# Altium PCB CM5IO_V2.PcbDoc (part 3 of 4)
Units mm, origin at the board's own origin, x right, y up, seen from the top; angles counter-clockwise.
Board outline 160 x 90 mm, 4 copper layers (F.Cu, In1.Cu, In2.Cu, B.Cu); 77 components, 161 nets, 674 pads, 703 vias.
Unrouted connection lines stored in the file: 47.
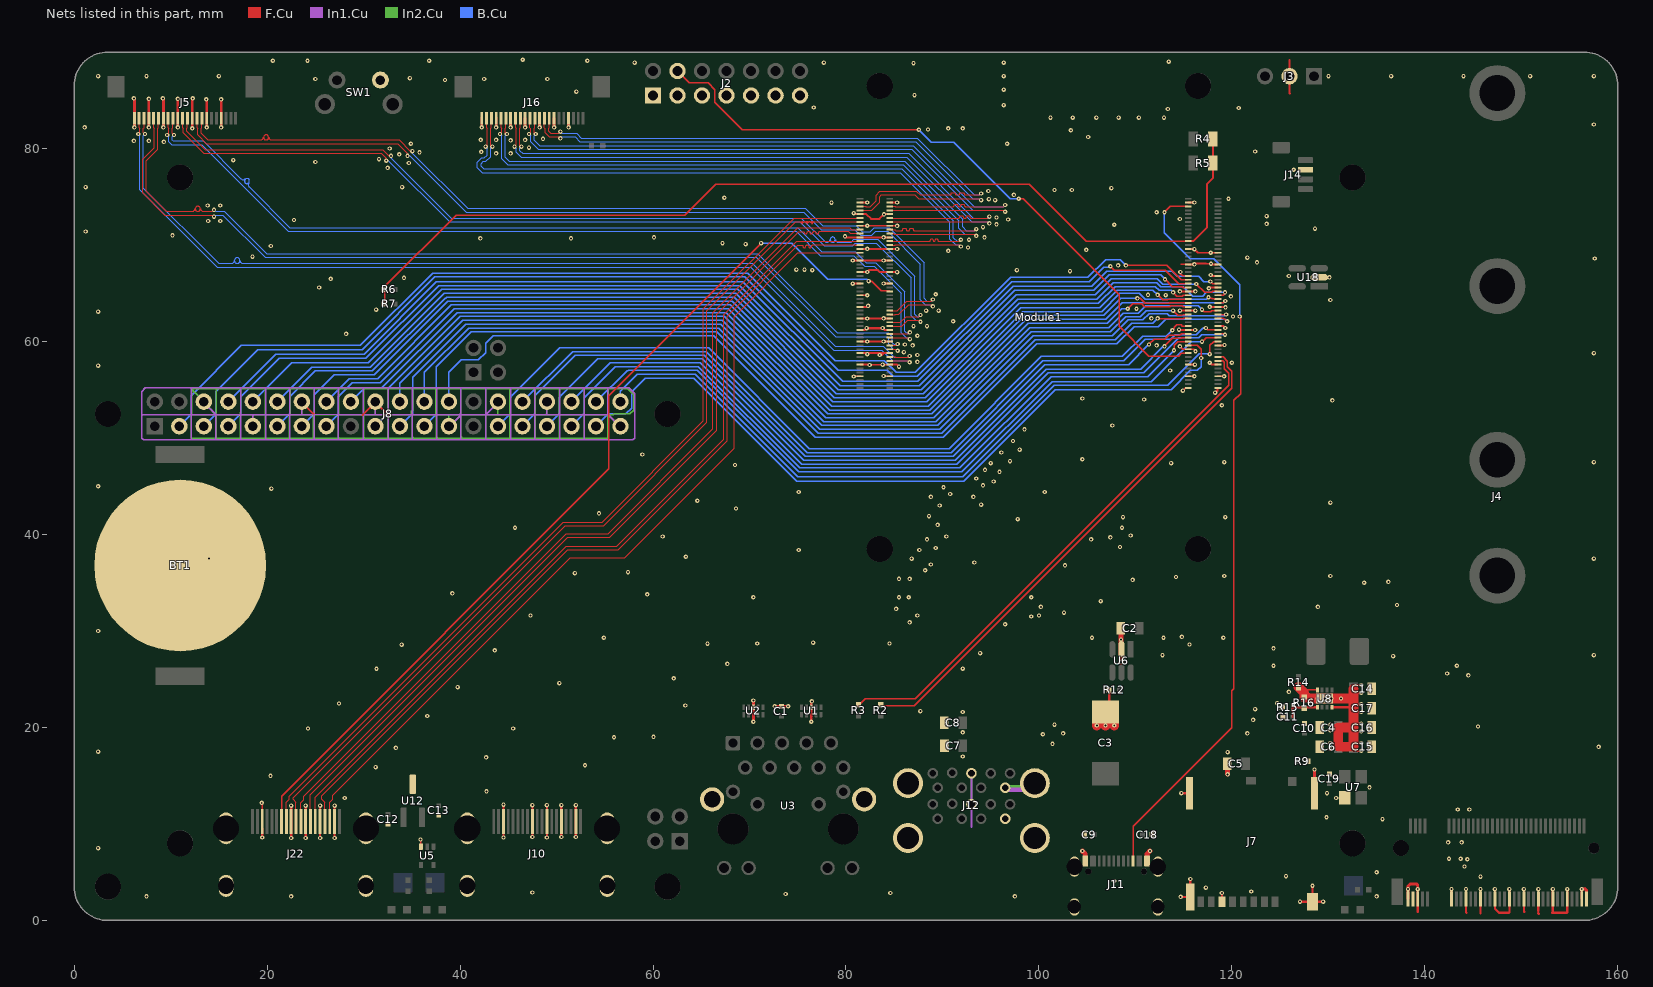
[diagram p4: the nets of this part, all layers, seen from the top]

## Via types
v1: diameter 0.45, hole 0.2, F.Cu to B.Cu, tented both sides, 703 vias

## Nets (pads, with @x,y where several pads share a name; then routed paths per layer and width w, separated by ;. In a path a pad name is that pad's centre, name@x,y a point inside that pad or via, vN(x,y) a via of type N, cw(c..) or ccw(c..) an arc to the next point about the centre after c; other vN are vias at no path point) (continued)
CC2: J11.B5 Module1.96 | length 79.2
  F.Cu w0.13: J11.B5@109.75,6.155 109.75,9.75 120,20 120,23.8 120.2,24 120.2,53.9 120.9,54.6 120.9,62.5 v1(120.8,62.6) ; v1(113,73.4) 113.6,74 Module1.96@115.42,74
  B.Cu w0.13: v1(113,73.4) 113,71.3 115.7,68.6 118.1,68.6 120.82,65.88 120.82,62.62 v1(120.8,62.6)
DPHY0_C_N: J5.8 Module1.127 | length 92.4
  F.Cu w0.127: v1(9.65,81.4) 9.81,81.56 9.81,82.115 9.75,82.175 J5.8@9.75,83.15 ; Module1.127@84.58,60.4 85.105,60.4 85.115,60.41 86.454,60.41 v1(86.615,60.249)
  B.Cu w0.127: v1(9.65,81.4) 9.81,81.24 9.81,80.721 10.121,80.41 13.221,80.41 22.221,71.41 74.821,71.41 77.321,68.91 80.821,68.91 81.921,67.81 82.921,67.81 85.71,65.021 85.71,60.921 86.221,60.41 86.454,60.41 v1(86.615,60.249)
DPHY0_C_P: J5.9 Module1.129 | length 94.1
  F.Cu w0.127: J5.9@10.25,83.15 10.25,82.175 10.19,82.115 10.19,81.56 v1(10.35,81.4) ; Module1.129@84.58,60.8 85.105,60.8 85.115,60.79 86.454,60.79 v1(86.615,60.952)
  B.Cu w0.127: v1(10.35,81.4) 10.19,81.24 10.19,80.879 10.279,80.79 13.379,80.79 17.286,76.883 17.32,76.849 ccw(c17.515,77.044) 17.71,76.849 ccw(c17.905,76.654) 18.1,76.849 18.134,76.814 ccw(c17.939,76.619) 18.134,76.424 ccw(c18.329,76.229) 18.134,76.034 22.379,71.79 74.979,71.79 77.479,69.29 80.979,69.29 82.079,68.19 83.079,68.19 86.09,65.179 86.09,61.079 86.379,60.79 86.454,60.79 v1(86.615,60.952)
DPHY0_D0_N: J5.2 Module1.115 | length 96.9
  F.Cu w0.127: v1(6.65,81.5) 6.81,81.66 6.81,82.115 6.75,82.175 J5.2@6.75,83.15 ; Module1.115@84.58,58 85.105,58 85.115,58.01 86.44,58.01 v1(86.6,57.85)
  B.Cu w0.127: v1(6.65,81.5) 6.81,81.34 6.81,75.721 14.821,67.71 70.121,67.71 78.721,59.11 82.018,59.11 82.027,59.119 82.373,59.119 82.382,59.11 83.721,59.11 84.821,58.01 86.44,58.01 v1(86.6,57.85)
DPHY0_D0_P: J5.3 Module1.117 | length 98.7
  F.Cu w0.127: J5.3@7.25,83.15 7.25,82.175 7.19,82.115 7.19,81.66 v1(7.35,81.5) ; Module1.117@84.58,58.4 85.105,58.4 85.115,58.39 86.49,58.39 v1(86.6,58.5)
  B.Cu w0.127: v1(7.35,81.5) 7.19,81.34 7.19,75.879 14.979,68.09 15.01,68.09 16.312,68.09 ccw(c16.312,68.384) 16.606,68.384 ccw(c16.9,68.384) 16.9,68.678 16.912,68.678 ccw(c16.912,68.384) 17.206,68.384 ccw(c17.5,68.384) 17.5,68.09 70.279,68.09 78.879,59.49 81.861,59.49 81.869,59.498 82.531,59.498 82.539,59.49 83.879,59.49 84.979,58.39 86.49,58.39 v1(86.6,58.5)
DPHY0_D1_N: J5.5 Module1.121 | length 94.6
  F.Cu w0.127: J5.5@8.25,83.15 8.25,82.175 8.31,82.115 8.31,80.079 7.11,78.879 7.11,75.421 9.421,73.11 14.34,73.11 v1(14.5,72.95) ; Module1.121@84.54,59.2 85.065,59.2 85.075,59.21 85.184,59.21 v1(85.345,59.049)
  B.Cu w0.127: v1(14.5,72.95) 14.66,73.11 15.421,73.11 19.821,68.71 70.721,68.71 78.921,60.51 84.221,60.51 84.41,60.321 84.41,59.721 84.921,59.21 85.184,59.21 v1(85.345,59.049)
DPHY0_D1_P: J5.6 Module1.123 | length 96.4
  F.Cu w0.127: J5.6@8.75,83.15 8.75,82.175 8.69,82.115 8.69,79.921 7.49,78.721 7.49,75.579 9.579,73.49 12.2,73.49 12.249,73.49 ccw(c12.249,73.766) 12.524,73.766 ccw(c12.8,73.766) 12.8,74.041 12.849,74.041 ccw(c12.849,73.766) 13.124,73.766 ccw(c13.4,73.766) 13.4,73.49 14.34,73.49 v1(14.5,73.65) ; Module1.123@84.54,59.6 85.065,59.6 85.075,59.59 85.184,59.59 v1(85.345,59.752)
  B.Cu w0.127: v1(14.5,73.65) 14.66,73.49 15.579,73.49 19.979,69.09 70.879,69.09 79.079,60.89 84.379,60.89 84.79,60.479 84.79,59.879 85.079,59.59 85.184,59.59 v1(85.345,59.752)
DPHY0_D2_N: J5.11 Module1.133 | length 92.2
  F.Cu w0.127: J5.11@11.25,83.15 11.25,82.175 11.31,82.115 11.31,81.621 13.421,79.51 31.821,79.51 32.351,78.98 v1(32.351,78.751) ; Module1.133@84.58,61.6 85.105,61.6 85.115,61.61 85.779,61.61 86.379,62.21 87.557,62.21 v1(87.719,62.049)
  B.Cu w0.127: v1(32.351,78.751) 32.58,78.751 38.921,72.41 75.221,72.41 77.721,69.91 80.679,69.91 80.979,70.21 83.121,70.21 86.743,66.589 86.743,62.689 87.221,62.21 87.557,62.21 v1(87.719,62.049)
DPHY0_D2_P: J5.12 Module1.135 | length 93.9
  F.Cu w0.127: J5.12@11.75,83.15 11.75,82.175 11.69,82.115 11.69,81.779 13.579,79.89 31.979,79.89 32.62,79.249 v1(32.849,79.249) ; Module1.135@84.58,62 85.105,62 85.115,61.99 85.621,61.99 86.221,62.59 87.557,62.59 v1(87.719,62.752)
  B.Cu w0.127: v1(32.849,79.249) 32.849,79.02 39.079,72.79 75.379,72.79 77.879,70.29 78,70.29 78.048,70.29 ccw(c78.048,70.566) 78.324,70.566 ccw(c78.6,70.566) 78.6,70.842 78.648,70.842 ccw(c78.648,70.566) 78.924,70.566 ccw(c79.2,70.566) 79.2,70.29 80.521,70.29 80.821,70.59 83.279,70.59 87.123,66.746 87.123,62.846 87.379,62.59 87.557,62.59 v1(87.719,62.752)
DPHY0_D3_N: J5.14 Module1.139 | length 92.8
  F.Cu w0.127: J5.14@12.75,83.15 12.75,82.175 12.81,82.115 12.81,81.421 13.721,80.51 33.521,80.51 34.564,79.467 v1(34.564,79.239) ; Module1.139@84.58,62.8 85.105,62.8 85.115,62.81 85.479,62.81 86.479,63.81 88.839,63.81 v1(89,63.649)
  B.Cu w0.127: v1(34.564,79.239) 34.792,79.239 40.621,73.41 75.621,73.41 77.421,71.61 80.921,71.61 81.521,71.01 82.679,71.01 83.079,71.41 84.321,71.41 87.71,68.021 87.71,64.321 88.221,63.81 88.839,63.81 v1(89,63.649)
DPHY0_D3_P: J5.15 Module1.141 | length 94.6
  F.Cu w0.127: J5.15@13.25,83.15 13.25,82.175 13.19,82.115 13.19,81.579 13.879,80.89 19.324,80.89 ccw(c19.324,81.166) 19.6,81.166 ccw(c19.876,81.166) 19.876,81.441 19.924,81.441 ccw(c19.924,81.166) 20.2,81.166 ccw(c20.476,81.166) 20.476,80.89 33.679,80.89 34.833,79.736 v1(35.061,79.736) ; Module1.141@84.58,63.2 85.105,63.2 85.115,63.19 85.321,63.19 86.321,64.19 88.839,64.19 v1(89,64.352)
  B.Cu w0.127: v1(35.061,79.736) 35.061,79.508 40.779,73.79 75.779,73.79 77.579,71.99 81.079,71.99 81.679,71.39 82.521,71.39 82.921,71.79 84.479,71.79 88.09,68.179 88.09,64.479 88.379,64.19 88.839,64.19 v1(89,64.352)
DPHY1_C_N: J16.8 Module1.187 | length 66.1
  F.Cu w0.127: v1(45.65,80.2) 45.81,80.36 45.81,82.115 45.75,82.175 J16.8@45.75,83.15 ; Module1.187@84.58,72.4 85.105,72.4 85.115,72.41 94.69,72.41 v1(94.85,72.25)
  B.Cu w0.127: v1(45.65,80.2) 45.81,80.04 45.81,79.621 46.321,79.11 86.321,79.11 93.021,72.41 94.69,72.41 v1(94.85,72.25)
DPHY1_C_P: J16.9 Module1.189 | length 66.1
  F.Cu w0.127: J16.9@46.25,83.15 46.25,82.175 46.19,82.115 46.19,80.36 v1(46.35,80.2) ; Module1.189@84.58,72.8 85.105,72.8 85.115,72.79 91.66,72.79 91.688,72.793 91.714,72.802 91.738,72.817 91.758,72.837 91.773,72.861 91.782,72.887 91.788,72.943 91.797,72.969 91.812,72.993 91.832,73.013 91.856,73.028 91.882,73.037 91.91,73.04 92.01,73.04 92.038,73.037 92.064,73.028 92.088,73.013 92.108,72.993 92.123,72.969 92.132,72.943 92.138,72.887 92.147,72.861 92.162,72.837 92.182,72.817 92.206,72.802 92.232,72.793 92.26,72.79 92.36,72.79 92.388,72.793 92.414,72.802 92.438,72.817 92.458,72.837 92.473,72.861 92.482,72.887 92.488,72.943 92.497,72.969 92.512,72.993 92.532,73.013 92.556,73.028 92.582,73.037 92.61,73.04 92.71,73.04 92.738,73.037 92.764,73.028 92.788,73.013 92.808,72.993 92.823,72.969 92.832,72.943 92.838,72.887 92.847,72.861 92.862,72.837 92.882,72.817 92.906,72.802 92.932,72.793 92.96,72.79 94.69,72.79 v1(94.85,72.95)
  B.Cu w0.127: v1(46.35,80.2) 46.19,80.04 46.19,79.779 46.479,79.49 86.479,79.49 93.179,72.79 94.69,72.79 v1(94.85,72.95)
DPHY1_D0_N: J16.2 Module1.175 | length 67.7
  F.Cu w0.127: v1(42.65,80.2) 42.81,80.36 42.81,82.115 42.75,82.175 J16.2@42.75,83.15 ; Module1.175@84.58,70 85.105,70 85.115,70.01 91.74,70.01 v1(91.9,69.85)
  B.Cu w0.127: v1(42.65,80.2) 42.81,80.04 42.81,79.329 42.521,79.04 42.271,79.04 41.81,78.579 41.81,78.021 42.321,77.51 85.621,77.51 90.76,72.371 90.76,70.621 91.371,70.01 91.74,70.01 v1(91.9,69.85)
DPHY1_D0_P: J16.3 Module1.177 | length 67.7
  F.Cu w0.127: J16.3@43.25,83.15 43.25,82.175 43.19,82.115 43.19,80.36 v1(43.35,80.2) ; Module1.177@84.58,70.4 85.105,70.4 85.115,70.39 88.63,70.39 88.658,70.393 88.684,70.402 88.708,70.417 88.728,70.437 88.743,70.461 88.752,70.487 88.758,70.543 88.767,70.569 88.782,70.593 88.802,70.613 88.826,70.627 88.852,70.637 88.88,70.64 88.89,70.64 88.918,70.637 88.944,70.627 88.968,70.613 88.988,70.593 89.003,70.569 89.012,70.543 89.018,70.487 89.027,70.461 89.042,70.437 89.062,70.417 89.086,70.402 89.112,70.393 89.14,70.39 89.13,70.39 89.158,70.393 89.184,70.402 89.208,70.417 89.228,70.437 89.243,70.461 89.252,70.487 89.258,70.543 89.267,70.569 89.282,70.593 89.302,70.613 89.326,70.627 89.352,70.637 89.38,70.64 89.39,70.64 89.418,70.637 89.444,70.627 89.468,70.613 89.488,70.593 89.503,70.569 89.512,70.543 89.518,70.487 89.527,70.461 89.542,70.437 89.562,70.417 89.586,70.402 89.612,70.393 89.64,70.39 91.74,70.39 v1(91.9,70.55)
  B.Cu w0.127: v1(43.35,80.2) 43.19,80.04 43.19,79.171 42.679,78.66 42.429,78.66 42.19,78.421 42.19,78.179 42.479,77.89 85.779,77.89 91.14,72.529 91.14,70.779 91.529,70.39 91.74,70.39 v1(91.9,70.55)
DPHY1_D1_N: J16.5 Module1.181 | length 66.4
  F.Cu w0.127: v1(44.15,81.5) 44.31,81.66 44.31,82.115 44.25,82.175 J16.5@44.25,83.15 ; Module1.181@84.54,71.2 84.911,71.2 84.921,71.21 85.021,71.11 93.34,71.11 v1(93.5,70.95)
  B.Cu w0.127: v1(44.15,81.5) 44.31,81.34 44.31,78.921 44.921,78.31 85.921,78.31 91.71,72.521 91.71,71.721 92.321,71.11 93.34,71.11 v1(93.5,70.95)
DPHY1_D1_P: J16.6 Module1.183 | length 66.3
  F.Cu w0.127: J16.6@44.75,83.15 44.75,82.175 44.69,82.115 44.69,81.66 v1(44.85,81.5) ; Module1.183@84.54,71.6 84.83,71.6 84.84,71.59 85.079,71.59 85.179,71.49 85.76,71.49 85.787,71.493 85.813,71.502 85.836,71.517 85.856,71.536 85.87,71.559 85.88,71.585 85.886,71.64 85.895,71.666 85.909,71.689 85.929,71.708 85.952,71.723 85.978,71.732 86.005,71.735 86.12,71.735 86.147,71.732 86.173,71.723 86.196,71.708 86.216,71.689 86.23,71.666 86.24,71.64 86.246,71.585 86.255,71.559 86.269,71.536 86.289,71.517 86.312,71.502 86.338,71.493 86.365,71.49 86.48,71.49 86.507,71.493 86.533,71.502 86.556,71.517 86.576,71.536 86.59,71.559 86.6,71.585 86.606,71.64 86.615,71.666 86.629,71.689 86.649,71.708 86.672,71.723 86.698,71.732 86.725,71.735 86.84,71.735 86.867,71.732 86.893,71.723 86.916,71.708 86.936,71.689 86.95,71.666 86.96,71.64 86.966,71.585 86.975,71.559 86.989,71.536 87.009,71.517 87.032,71.502 87.058,71.493 87.085,71.49 93.34,71.49 v1(93.5,71.65)
  B.Cu w0.127: v1(44.85,81.5) 44.69,81.34 44.69,79.079 45.079,78.69 86.079,78.69 92.09,72.679 92.09,71.879 92.479,71.49 93.34,71.49 v1(93.5,71.65)
DPHY1_D2_N: J16.11 Module1.193 | length 66.8
  F.Cu w0.127: v1(47.15,81.5) 47.31,81.66 47.31,82.115 47.25,82.175 J16.11@47.25,83.15 ; Module1.193@84.58,73.6 85.105,73.6 85.115,73.61 96.34,73.61 v1(96.5,73.45)
  B.Cu w0.127: v1(47.15,81.5) 47.31,81.34 47.31,80.721 48.121,79.91 86.821,79.91 93.121,73.61 96.34,73.61 v1(96.5,73.45)
DPHY1_D2_P: J16.12 Module1.195 | length 66.7
  F.Cu w0.127: J16.12@47.75,83.15 47.75,82.175 47.69,82.115 47.69,81.66 v1(47.85,81.5) ; Module1.195@84.58,74 85.105,74 85.115,73.99 91.09,73.99 91.118,73.993 91.144,74.002 91.168,74.017 91.188,74.037 91.203,74.061 91.212,74.087 91.218,74.143 91.227,74.169 91.242,74.193 91.262,74.213 91.286,74.228 91.312,74.237 91.34,74.24 91.44,74.24 91.468,74.237 91.494,74.228 91.518,74.213 91.538,74.193 91.553,74.169 91.562,74.143 91.568,74.087 91.577,74.061 91.592,74.037 91.612,74.017 91.636,74.002 91.662,73.993 91.69,73.99 91.79,73.99 91.818,73.993 91.844,74.002 91.868,74.017 91.888,74.037 91.903,74.061 91.912,74.087 91.918,74.143 91.927,74.169 91.942,74.193 91.962,74.213 91.986,74.228 92.012,74.237 92.04,74.24 92.14,74.24 92.168,74.237 92.194,74.228 92.218,74.213 92.238,74.193 92.253,74.169 92.262,74.143 92.268,74.087 92.277,74.061 92.292,74.037 92.312,74.017 92.336,74.002 92.362,73.993 92.39,73.99 96.34,73.99 v1(96.5,74.15)
  B.Cu w0.127: v1(47.85,81.5) 47.69,81.34 47.69,80.879 48.279,80.29 86.979,80.29 93.279,73.99 96.34,73.99 v1(96.5,74.15)
DPHY1_D3_N: J16.14 Module1.194 | length 63.5
  F.Cu w0.127: J16.14@48.75,83.15 48.75,82.175 48.81,82.115 48.81,81.621 49.221,81.21 50.24,81.21 v1(50.4,81.05) ; Module1.194@81.5,73.6 82.025,73.6 82.035,73.61 82.679,73.61 83.49,74.421 83.49,75.021 83.679,75.21 87.121,75.21 87.521,74.81 93.84,74.81 v1(94,74.65)
  B.Cu w0.127: v1(50.4,81.05) 50.56,81.21 51.921,81.21 52.421,80.71 87.221,80.71 93.121,74.81 93.84,74.81 v1(94,74.65)
DPHY1_D3_P: J16.15 Module1.196 | length 63.5
  F.Cu w0.127: J16.15@49.25,83.15 49.25,82.175 49.19,82.115 49.19,81.779 49.379,81.59 50.24,81.59 v1(50.4,81.75) ; Module1.196@81.5,74 82.025,74 82.035,73.99 82.521,73.99 83.11,74.579 83.11,75.179 83.521,75.59 87.279,75.59 87.679,75.19 90.76,75.19 90.788,75.193 90.814,75.202 90.838,75.217 90.858,75.237 90.873,75.261 90.882,75.287 90.888,75.343 90.897,75.369 90.912,75.393 90.932,75.413 90.956,75.428 90.982,75.437 91.01,75.44 91.21,75.44 91.238,75.437 91.264,75.428 91.288,75.413 91.308,75.393 91.323,75.369 91.332,75.343 91.338,75.287 91.347,75.261 91.362,75.237 91.382,75.217 91.406,75.202 91.432,75.193 91.46,75.19 91.66,75.19 91.688,75.193 91.714,75.202 91.738,75.217 91.758,75.237 91.773,75.261 91.782,75.287 91.788,75.343 91.797,75.369 91.812,75.393 91.832,75.413 91.856,75.428 91.882,75.437 91.91,75.44 92.11,75.44 92.138,75.437 92.164,75.428 92.188,75.413 92.208,75.393 92.223,75.369 92.232,75.343 92.238,75.287 92.247,75.261 92.262,75.237 92.282,75.217 92.306,75.202 92.332,75.193 92.36,75.19 93.84,75.19 v1(94,75.35)
  B.Cu w0.127: v1(50.4,81.75) 50.56,81.59 52.079,81.59 52.579,81.09 87.379,81.09 93.279,75.19 93.84,75.19 v1(94,75.35)
EEPROM_nWP: J2.4 Module1.20 | length 67.9
  F.Cu w0.13: J2.4@62.54,88.04 63.78,86.8 65.7,86.8 66.4,86.1 66.4,84.8 69.25,81.95 v1(87.55,81.95) ; v1(97.9,74.8) 98.35,74.8 108.3,64.85 108.3,61.6 111.4,58.5 114.46,58.5 114.76,58.8 Module1.20@115.42,58.8
  B.Cu w0.13: v1(87.55,81.95) 88.85,80.65 91.15,80.65 97.02,74.78 97.88,74.78 v1(97.9,74.8)
ETH_LEDG: Module1.17 R2.1 | length 54.2
  F.Cu w0.13: R2.1@83.6,22.27 87.092,22.27 120,55.178 120,56.9 119.5,57.4 119.5,57.982 119.082,58.4 Module1.17@118.5,58.4
ETH_LEDY: Module1.15 R3.1 | length 55.4
  F.Cu w0.13: R3.1@81.3,22.3 82,23 87.2,23 119.68,55.48 119.68,56.72 119.2,57.2 119.2,57.83 119.03,58 Module1.15@118.5,58
FB: C11.1 R15.1 R16.2 U8.1 | length 3.5
  F.Cu w0.23: 126.285,21.1 126.285,22.1 ; 126.3,22.1 127.5,22.1 U8.1@128.85,22.1
GND: BT1.2 C1.1 C2.1 C3.1 C4.1 C5.1 C6.1 C7.1 C8.1 C9.1 C10.1 C12.1 C13.1 C14.1 C15.1 C16.1 C17.1 C18.1 C19.1 J2.1 J2.3 J2.5 J2.7 J2.9 J2.11 J2.13 J3.2 J4.1 J4.3 J4.9 J4.15 J4.21 J4.27 J4.33 J4.39 J4.45 J4.51 J4.57 J4.71 J4.73 J4.75 J5.1 J5.4 J5.7 J5.10 J5.13 J5.16 J5.19 J7.6 J7.11 J8.6 J8.9 J8.14 J8.20 J8.25 J8.30 J8.34 J8.39 J10.2 J10.5 J10.8 J10.11 J10.17 J10.SH1 J10.SH2 J10.SH3 J10.SH4 J11.A1 J11.A12 J11.B1 J11.B12 J11.S1 J12.10 J12.A4 J12.A7 J12.B4 J12.B7 J14.3 J16.1 J16.4 J16.7 J16.10 J16.13 J16.16 J16.19 J22.2 J22.5 J22.8 J22.11 J22.17 J22.SH1 J22.SH2 J22.SH3 J22.SH4 Module1.1 Module1.2 Module1.7 Module1.8 Module1.13 Module1.14 Module1.22 Module1.23 Module1.32 Module1.33 Module1.42 Module1.43 Module1.52 Module1.53 Module1.59 Module1.60 Module1.65 Module1.66 Module1.71 Module1.74 Module1.98 Module1.107 Module1.108 Module1.113 Module1.114 Module1.119 Module1.120 Module1.125 Module1.126 Module1.131 Module1.132 Module1.137 Module1.138 Module1.144 Module1.150 Module1.155 Module1.156 Module1.161 Module1.162 Module1.167 Module1.168 Module1.173 Module1.174 Module1.179 Module1.180 Module1.185 Module1.186 Module1.191 Module1.192 Module1.197 Module1.198 R9.1 R12.2 R14.1 R16.1 SW1.2 U1.3 U2.3 U3.19 U3.20 U5.3 U6.2 U7.2 U8.4 U8.8 U8.9 U12.3 U18.2 | length 760.5
  F.Cu w0.13: v1(19.45,12.188) 19.5,12.138 J22.17@19.5,10.28 ; v1(35.9,8.4) 35.95,8.35 U5.3@35.95,7.65 ; v1@82.2,63.6 v1(82.3,63.7) ; v1(82.45,57.575) 82.475,57.6 82.85,57.6 Module1.113@84.58,57.6 ; v1(114.645,67.2) 114.645,67.048 114.893,66.8 Module1.60@115.42,66.8 ; 114.7,68 Module1.66@115.46,68 ; v1@117.6,57.9 v1(117.7,57.8) ; J7.6@118.95,1.435 118.95,2.532 v1(118.95,2.85) ; 119,61.6 119.1,61.6 ; 127.5,23.6 127.8,23.9 U8.8@128.85,23.9
  F.Cu w0.2: v1(79.9,70.9) 80,70.8 81.5,70.8 v1(83.9,70.8) Module1.179@84.6,70.8 ; v1(80.7,66) Module1.156@81.5,66 ; v1(80.7,68.4) 81.5,68.4 v1(83.9,68.4) Module1.167@84.58,68.4 ; v1(80.8,56.37) 80.83,56.4 Module1.108@81.5,56.4 ; v1(80.8,73.3) 80.9,73.2 81.5,73.2 82.1,73.2 82.6,72.7 83.454,72.7 v1(83.939,73.185) 83.954,73.2 Module1.191@84.6,73.2 ; Module1.114@81.5,57.6 82.425,57.6 v1(82.45,57.575) ; Module1.120@81.5,58.8 83.9,58.8 ; Module1.126@81.5,60 v1(82.2,60) ; Module1.132@81.5,61.2 81.961,61.2 v1(82.146,61.384) ; Module1.138@81.5,62.4 82.19,62.4 v1(82.2,62.39) 82.21,62.4 v1(83.9,62.4) Module1.137@84.6,62.4 ; Module1.150@81.5,64.8 v1(82.2,64.8) ; Module1.162@81.5,67.2 v1(82.2,67.2) 82.4,67.4 83.3,67.4 83.5,67.2 Module1.161@84.58,67.2 ; Module1.174@81.5,69.6 v1(82.2,69.6) Module1.173@84.58,69.6 ; Module1.186@81.5,72 v1(82.2,72) Module1.185@84.58,72 ; Module1.198@81.5,74.4 82.19,74.4 v1(82.2,74.41) ; Module1.144@81.65,63.6 v1@82.2,63.6 ; v1(83.5,58.6) 83.7,58.6 83.9,58.8 ; v1(83.8,61.4) 84,61.2 Module1.131@84.58,61.2 ; v1(83.9,56.43) 83.93,56.4 Module1.107@84.6,56.4 ; v1@83.9,60.01 83.91,60 Module1.125@84.58,60 ; v1(83.902,66.007) 83.909,66 Module1.155@84.6,66 ; Module1.119@84.58,58.8 83.9,58.8 ; Module1.113@84.6,57.6 85.3,57.6 v1(85.5,57.4) ; Module1.161@84.6,67.2 85.29,67.2 v1(85.3,67.19) ; Module1.173@84.6,69.6 85.29,69.6 v1(85.3,69.59) ; Module1.185@84.6,72 85.29,72 v1(85.3,71.99) ; Module1.197@84.6,74.4 85.29,74.4 v1(85.3,74.41) ; v1(114.517,61.226) 114.543,61.2 115.42,61.2 116.178,61.2 v1(116.181,61.203) ; v1(114.6,59.5) 114.9,59.2 115.42,59.2 116.02,59.2 v1(116.227,58.993) ; v1(114.6,63.2) 115.42,63.2 v1(116.2,63.2) ; v1(114.6,65.2) 115.42,65.2 v1(116.2,65.2) ; v1(114.913,54.907) Module1.2@115.206,55.2 ; Module1.8@115.42,56.4 v1(116.1,56.4) ; Module1.14@115.42,57.6 v1@116.1,57.6 ; Module1.66@115.42,68 v1(116.1,68) 116.2,68.1 117.3,68.1 117.337,68.063 v1(117.825,68.063) 117.889,68 Module1.65@118.5,68 ; Module1.74@115.42,69.6 116.08,69.6 v1(116.1,69.58) 116.48,69.2 v1(117.8,69.2) Module1.71@118.5,69.2 ; Module1.98@115.42,74.4 116.085,74.4 v1(116.1,74.415) ; v1(117.6,65.52) 117.68,65.6 Module1.53@118.5,65.6 ; v1(117.7,57.8) 117.9,57.6 Module1.13@118.5,57.6 ; v1(117.7,63.6) 118.5,63.6 119.276,63.6 v1(119.327,63.549) ; v1(117.8,66.9) 117.9,66.8 Module1.59@118.5,66.8 ; v1@118.319,54.745 118.5,54.926 Module1.1@118.5,55.2 ; Module1.7@118.5,56.4 v1(119.195,56.4) ; Module1.23@118.5,59.6 119.181,59.6 v1(119.219,59.638) ; Module1.33@118.5,61.6 119,61.6 ; 119.1,61.6 v1(119.3,61.4)
  F.Cu w0.23: v1@7.7,85.2 v1(7.75,85.15) J5.4@7.75,83.15 v1(7.75,82.2) ; v1(19.5,8.6) J22.17@19.5,9.5 ; v1(22.5,8.55) v1(22.5,11.9) ; J8.14@23.61,53.72 24.8,52.53 ; v1(24,8.55) v1(24,11.9) ; v1@25.5,8.5 v1(25.5,11.9) ; v1@27,8.5 v1(27,11.9) ; 29.9,52.4 29.91,52.4 31.23,53.72 32.45,52.5 32.5,52.5 ; v1(44.5,8.6) v1(44.5,12) ; v1(47.5,8.65) v1(47.5,11.95) ; v1(49,8.6) v1(49,11.95) ; v1(50.5,8.65) v1(50.5,11.95) ; v1(52,8.65) v1(52,11.95) ; v1(82.146,61.384) 83.784,61.384 v1(83.8,61.4) ; v1(82.2,60) 83.89,60 v1@83.9,60.01 ; C3.1@106.9,21.525 107.29,21.915 R12.2@107.29,23.9 ; v1(114.68,2.45) 114.705,2.425 J7.11@115.68,2.425 ; v1(114.75,13.2) 114.76,13.19 J7.11@115.6,13.19 ; v1(118.95,2.85) 118.96,2.84 J7.6@118.96,1.925 ; 125.96,89.16 J3.2@125.96,87.5 125.96,85.74 126,85.7 ; v1(127.05,1.95) J7.11@128.33,1.95 ; J7.11@128.34,1.94 129.44,1.94 v1(129.45,1.95) ; J7.11@128.35,1.95 v1(128.35,3.6) ; U18.2@129,66.65 v1(130.1,66.65) ; U8.4@130.35,22.1 132.5,22.1 ; v1(133.4,17.6) 133,17.6 132.6,18 133,18.4 v1(133.4,18.4) ; v1(133.4,19.6) 133,19.6 132.6,20 133,20.4 v1(133.4,20.4) ; v1(133.4,21.6) 132.988,21.6 132.587,22 132.988,22.4 v1(133.4,22.4) ; v1(133.4,23.6) 133,23.6 132.6,24 133,24.4 v1(133.4,24.4) ; J4.57@142.75,2.225 v1(142.75,3.25) ; v1(144.25,3.25) J4.51@144.25,2.225 144.25,0.85 144.3,0.8 ; 145.75,0.75 J4.45@145.75,2.225 ; v1(147.25,3.25) J4.39@147.25,2.225 147.25,1.22 147.67,0.8 148.7,0.8 148.75,0.85 J4.33@148.75,2.225 v1(148.75,3.25) ; v1(150.25,3.25) J4.27@150.25,2.225 150.25,0.95 150.3,0.9 ; 151.75,0.75 151.8,0.7 ; 151.75,1 J4.21@151.75,2.225 ; v1(153.25,3.25) J4.15@153.25,2.225 153.25,0.85 153.2,0.8 154.7,0.8 154.75,0.85 J4.9@154.75,2.225 v1(154.75,3.25) ; J4.3@156.25,2.225 v1(156.25,3.25)
  F.Cu w0.3: v1(6.2,85.2) 6.25,85.15 J5.1@6.25,83.15 v1(6.25,82.2) ; v1(9.2,85.2) 9.25,85.15 J5.7@9.25,83.15 v1(9.25,82.2) ; v1@10.7,85.2 v1(10.75,85.15) J5.10@10.75,83.15 v1(10.75,82.2) ; v1(12.25,82.1) J5.13@12.25,83.15 12.25,85.15 v1(12.3,85.2) ; v1(13.7,85.1) 13.75,85.05 J5.16@13.75,83.15 v1(13.75,82.2) ; v1(15.25,82.2) J5.19@15.25,83.15 v1(15.25,85.1) ; v1(42.25,82.2) J16.1@42.25,83.15 ; v1(43.75,82.2) J16.4@43.75,83.15 ; v1(45.25,82.2) J16.7@45.25,83.15 ; v1(46.75,82.2) J16.10@46.75,83.15 ; v1(48.25,82.2) J16.13@48.25,83.15 ; v1(49.75,82.2) J16.16@49.75,83.15 ; v1(51.25,82.2) J16.19@51.25,83.15 ; v1(70.4,20.6) 70.4,21.33 v1(70.4,22.8) ; v1(72.6,22.2) 72.615,22.185 73.3,22.185 73.72,22.185 73.735,22.2 v1(74,22.2) ; v1(76.4,20.6) 76.4,21.33 U1.3@76.4,22.1 76.4,22.64 v1(76.468,22.707) ; J7.11@115.68,1.925 v1(115.68,4.3) ; J7.11@128.56,12.69 v1(128.56,15.65) ; J4.75@138.25,2.225 v1(138.25,3.25) 138.25,3.55 138.5,3.8 139.1,3.8 139.25,3.65 v1(139.25,3.25) J4.71@139.25,2.225 139.25,0.95 ; v1(156.25,3.25) 156.55,3.25 156.6,3.3 156.75,3.15 J4.1@156.75,2.225
  F.Cu w0.5: BT1.2@11,37.5 v1(14,37.5) ; v1(104.5,7.2) 104.8,6.9 J11.A1@104.8,6.155 ; v1(108.5,26.8) 108.5,27.875 v1(108.5,29.1) C2.1@108.5,30.3 ; J11.A12@111.2,6.155 111.2,6.9 v1(111.5,7.2) ; v1(119.55,15.15) C5.1@119.55,16.213
  F.Cu w1: v1(106,20.2) 106,20.625 C3.1@106.9,21.525 ; v1(106.9,20.2) C3.1@106.9,21.525 ; v1(107.8,20.2) 107.8,20.625 C3.1@106.9,21.525 ; R14.1@126.9,24.2 127.5,23.6 127.5,23.07 127.954,23.07 128.024,23 v1(129.6,23) 132.6,23 ; 132.6,24 132.6,23 ; 132.6,20 131,20 131,18 132.6,18 132.6,20 ; 132.6,20 132.6,22 132.6,23
  In1.Cu w0.13: J8.6@13.45,53.67 14.72,52.4 ; 14.7,52.4 14.7,49.9 14.6,49.8 ; J8.9@18.53,51.13 18.53,52.332 18.598,52.4 ; 22.4,52.4 22.35,52.45 ; J8.14@23.61,53.67 23.61,52.468 23.6,52.458 23.6,52.4 ; J8.20@31.23,53.67 31.23,52.468 31.298,52.4 ; J8.25@38.85,51.13 40.12,52.4 ; 39.95,52.4 40.1,52.55 ; J8.30@43.93,53.67 42.66,52.4 ; J8.34@49.01,53.67 49.01,52.468 49.078,52.4 ; 50.35,52.55 50.25,52.45 50.25,52.4 ; 55.3,52.4 55.3,55.2 ; J8.39@56.63,51.13 55.36,52.4 50.25,52.4 ; 7,52.4 7,50 7.2,49.8 12.2,49.8 ; 7,52.4 15.4,52.4 19.85,52.4 23.6,52.4 ; 7,52.4 7,52.9 7,54.8 7.4,55.2 12.2,55.2 ; 12.2,49.8 12.15,49.85 12.15,50.25 12.15,54.55 12.15,55.15 12.2,55.2 ; 12.2,49.8 14.6,49.8 ; 12.2,55.2 17.2,55.2 ; 14.6,49.8 17.3,49.8 ; 17.2,55.2 19.9,55.2 ; 17.2,55.2 17.25,55.15 17.25,54.4 17.25,50.4 17.25,49.85 17.3,49.8 ; 17.3,49.8 19.9,49.8 ; 19.9,49.8 19.85,49.85 19.85,50.25 19.85,54.55 19.85,55.15 19.9,55.2 ; 19.9,49.8 22.4,49.8 ; 19.9,55.2 22.4,55.2 ; 22.35,52.45 22.35,54.85 22.35,55.15 22.4,55.2 ; 22.35,52.45 22.35,49.85 22.4,49.8 ; 22.4,49.8 24.8,49.8 ; 22.4,55.2 24.9,55.2 ; 23.6,52.4 24.932,52.418 27.4,52.45 27.45,52.4 35.05,52.4 40.2,52.4 42.66,52.4 ; 24.8,49.8 24.9,49.9 24.9,54.75 24.9,55.2 ; 24.8,49.8 27.4,49.8 ; 24.9,55.2 27.4,55.2 ; 27.4,49.8 27.4,50.35 27.4,55.2 ; 27.4,49.8 29.9,49.8 ; 27.4,55.2 30,55.2 ; 29.9,49.8 29.95,49.85 29.95,50.35 29.95,54.5 29.95,55.15 30,55.2 ; 29.9,49.8 32.5,49.8 ; 30,55.2 32.5,55.2 ; 32.5,49.8 32.55,49.85 32.55,50.25 32.55,54.35 32.55,55.15 32.5,55.2 ; 32.5,49.8 35,49.8 ; 32.5,55.2 35.1,55.2 ; 35,49.8 35.05,49.85 35.05,50.4 35.05,54.35 35.05,55.15 35.1,55.2 ; 35,49.8 37.6,49.8 ; 35.1,55.2 37.7,55.2 ; 37.6,49.8 40.1,49.8 ; 37.6,49.8 37.6,52.4 37.6,54.3 37.6,55.1 37.7,55.2 ; 37.7,55.2 40.1,55.2 ; 40.1,49.8 42.7,49.8 ; 40.1,49.8 40.1,50.2 40.1,54.45 40.1,55.2 ; 40.1,55.2 42.6,55.2 ; 42.6,55.2 42.66,55.14 42.66,52.4 ; 42.6,55.2 45.2,55.2 ; 42.66,52.4 42.66,50.41 42.66,49.84 42.7,49.8 ; 42.66,52.4 50.25,52.4 ; 42.7,49.8 45.2,49.8 ; 45.2,49.8 47.7,49.8 ; 45.2,49.8 45.25,49.85 45.25,50.45 45.25,55.15 45.2,55.2 ; 45.2,55.2 47.7,55.2 ; 47.7,49.8 47.75,49.85 47.75,52.55 47.75,54.75 47.75,55.15 47.7,55.2 ; 47.7,49.8 50.4,49.8 ; 47.7,55.2 50.3,55.2 ; 50.3,55.2 52.7,55.2 ; 50.3,55.2 50.35,55.15 50.35,54.5 50.35,50.25 50.35,49.85 50.4,49.8 ; 50.4,49.8 52.9,49.8 ; 52.7,55.2 52.85,55.05 52.85,54.4 52.85,50.35 52.85,49.85 52.9,49.8 ; 52.7,55.2 55.3,55.2 ; 52.9,49.8 57.9,49.8 58.1,50 58.1,53.797 58.1,54.6 57.5,55.2 55.3,55.2
  In1.Cu w0.2: 93,9.7 J12.B7@93,15.05
  In1.Cu w0.5: J12.B4@96.5,13.55 J12.10@99.09,13.55
  In2.Cu w0.13: J8.6@13.45,53.67 14.3,52.82 14.3,52.8 14.7,52.4 15.2,52.4 ; J8.6@13.45,53.8 12.2,55.05 ; J8.9@18.53,51.13 18.53,52.332 18.598,52.4 ; 22.4,52.4 22.4,54.65 22.4,55.1 ; J8.14@23.61,53.67 23.61,52.468 23.678,52.4 ; 27.35,52.4 27.4,52.35 27.4,50.3 27.4,50.1 27.5,50 ; 27.4,52.4 27.45,52.45 27.45,53 27.45,54.8 27.45,55.05 27.5,55.1 ; J8.20@31.23,53.67 31.23,52.53 31.2,52.5 31.2,52.4 ; 35,52.35 34.95,52.4 ; J8.25@38.85,51.13 38.85,52.35 38.9,52.4 ; 38.85,52.332 38.8,52.382 38.8,52.4 ; 43.9,52.4 43.9,52.438 43.93,52.468 J8.30@43.93,53.67 ; 45.15,50.05 45.15,52.4 45.15,55.05 45.2,55.1 ; 48.9,52.4 49.01,52.51 J8.34@49.01,53.67 ; 55.36,52.4 J8.39@56.63,51.13 ; 12.15,52.42 14.72,52.42 ; 12.15,52.42 12.15,50.05 12.2,50 14.7,50 ; 12.15,52.42 12.2,52.47 12.2,55.05 ; 12.2,55.05 12.25,55.1 14.7,55.1 ; 14.7,50 17.3,50 ; 14.7,50 14.72,50.02 14.72,50.68 14.72,52.42 ; 14.7,55.1 17.3,55.1 ; 14.7,55.1 14.72,55.08 14.72,52.42 ; 14.72,52.42 15.18,52.42 15.2,52.4 ; 15.2,52.4 19.8,52.4 ; 17.3,50 17.2,50.1 17.2,50.35 17.2,52.4 17.2,52.6 17.25,52.65 17.25,54.6 17.25,55.05 17.3,55.1 ; 17.3,50 19.8,50 ; 17.3,55.1 19.8,55.1 ; 19.8,50 19.8,50.4 19.8,52.4 ; 19.8,50 22.3,50 ; 19.8,52.4 22.3,52.4 ; 19.8,52.4 19.8,54.85 19.8,55 19.8,55.1 ; 19.8,55.1 22.4,55.1 ; 22.3,50 24.8,50 ; 22.3,50 22.3,52.4 ; 22.3,52.4 24.8,52.4 ; 22.4,55.1 24.9,55.1 ; 24.8,50 27.5,50 ; 24.8,50 24.8,50.2 24.8,52.4 ; 24.8,52.4 24.9,52.4 ; 24.9,52.4 27.3,52.4 30,52.4 ; 24.9,52.4 24.9,54.55 24.9,55.1 ; 24.9,55.1 27.5,55.1 ; 27.5,50 30.1,50 ; 27.5,55.1 30,55.1 ; 30,52.4 31.2,52.4 ; 30,52.4 30,55.1 ; 30,52.4 30,50.35 30,50.1 30.1,50 ; 30,55.1 32.5,55.1 ; 30.1,50 32.6,50 ; 31.2,52.4 32.5,52.4 ; 32.5,52.4 32.5,55.1 ; 32.5,52.4 32.5,50.55 32.5,50.1 32.6,50 ; 32.5,52.4 34.95,52.4 ; 32.5,55.1 35.1,55.1 ; 32.6,50 35.2,50 ; 34.95,52.4 35.1,52.4 ; 34.95,52.4 34.95,52.75 35.1,52.9 35.1,54.4 35.1,55.1 ; 35.1,52.4 35.05,52.35 35.05,50.6 35.05,50.15 35.2,50 ; 35.1,52.4 37.5,52.4 ; 35.1,55.1 37.5,55.1 ; 35.2,50 37.7,50 ; 37.5,52.4 37.5,52.3 37.55,52.25 37.55,50.45 37.55,50.15 37.7,50 ; 37.5,52.4 37.5,54.8 37.5,55.1 ; 37.5,52.4 38.8,52.4 ; 37.5,55.1 40,55.1 ; 37.7,50 40.2,50 ; 38.8,52.4 38.9,52.4 ; 38.9,52.4 39.95,52.4 42.65,52.4 ; 40,55.1 40.1,55 40.1,54.75 40.1,52.4 40.1,50.2 40.2,50.1 40.2,50 ; 40,55.1 42.7,55.1 ; 40.2,50 42.7,50 ; 42.65,52.4 55.9,52.4 56,52.5 57.55,52.5 57.6,52.5 58,52.9 58,53.897 58,54.5 57.4,55.1 55.3,55.1 ; 42.65,52.4 42.65,54.5 42.65,55.05 42.7,55.1 ; 42.65,52.4 42.65,50.25 42.65,50.05 42.7,50 ; 42.7,50 47.8,50 ; 42.7,55.1 45.2,55.1 ; 45.2,55.1 47.8,55.1 ; 47.8,50 47.8,52.4 47.8,55.1 ; 47.8,50 50.3,50 ; 47.8,55.1 50.3,55.1 ; 50.3,50 52.9,50 ; 50.3,50 50.3,50.2 50.3,52.4 50.3,54.5 50.3,55.1 ; 50.3,55.1 52.8,55.1 ; 52.8,55.1 52.85,55.05 52.85,54.75 52.85,52.4 52.85,50.05 52.9,50 ; 52.8,55.1 55.3,55.1 ; 52.9,50 55.3,50 55.3,50.4 55.3,52.4 55.3,52.55 55.35,52.6 55.35,54.3 55.35,55.05 55.3,55.1
  In2.Cu w0.2: J12.A7@93,11.85 J12.B7@93,15.05
  In2.Cu w0.5: J12.B4@96.5,13.55 96.75,13.8 98.84,13.8 J12.10@99.09,13.55
  other v1: 7.5,2.5 22.5,2.5 97.5,2.5 135,2.5 73.75,2.75 84.6,2.85 47.5,2.9 122,3 145.75,3.25 151.75,3.25 117.3,3.4 107.8,4.1 145.75,4.55 125.6,4.6 135,5 144.1,5.6 144.4,6.35 142.5,6.4 143.7,6.4 2.5,7.5 142.4,8.1 143.8,8.1 25.5,8.55 27,8.55 135.6,10.5 129.8,10.7 143.4,11.5 144.6,11.5 28.05,12.688 130.8,12.7 129.85,13.2 42.75,13.388 134.25,13.8 20.35,14.988 31.25,15.888 52.95,16.088 42.7,16.9 92.1,17 119.55,17.45 2.5,17.5 130.2,17.8 33.35,17.888 158,18 101.4,18.3 130.2,18.4 55.95,18.988 60.05,19.025 100.4,19.3 102.5,19.4 121.6,19.4 92.1,19.5 130.2,19.7 24.25,19.9 45.5,19.9 145.5,20.1 101.6,20.3 130.2,20.3 122.2,20.8 36.6,21.2 92.1,21.6 87.7,21.7 122.4,21.9 63.35,22.275 27.45,22.488 124.7,22.5 128.9,23 130.3,23 131.3,23 125.9,23.7 39.75,24.188 50.3,24.6 62.15,25.088 144.5,25.4 142.3,25.6 31.35,26.088 92.1,26.1 124.3,26.4 143.3,26.4 67.7,26.6 136.7,27.4 112.8,27.5 157.5,27.5 93.9,27.7 43.6,28 124.3,28.2 33.95,28.588 115.6,28.6 65.65,28.688 70.8,28.7 84.5,28.7 76.6,28.8 54.9,29.3 105.5,29.3 112.9,29.3 119.1,29.3 114.8,29.4 2.5,30 96.5,30.7 86.6,30.9 99.2,31.5 47.3,31.6 87.4,31.6 100,31.6 102.6,31.9 85.2,32.3 100.2,32.5 128.9,32.5 137.1,32.7 106.4,33.1 70.4,33.5 85.5,33.5 86.5,33.5 99.2,33.5 59.4,33.8 39.2,33.9 133.7,35 136.2,35.1 109.7,35.3 85.5,35.4 86.6,35.4 114.2,35.6 119.2,35.7 130.2,35.7 51.9,36 57.4,36.1 88.2,36.3 102.7,36.8 88.8,36.9 93.3,37.1 86.8,37.5 157.5,37.5 63.4,37.7 75.1,38.4 87.6,38.4 89.3,38.6 108.4,38.7 88.4,39.5 105.4,39.5 107.4,39.7 61,39.8 90.4,39.8 109.5,39.9 45.7,40.7 108.6,40.7 89.5,41 97.8,41.6 108.7,41.8 119.3,41.8 88.6,41.9 54.4,42.2 68.6,42.7 89.7,43 94,43.1 130.2,43.3 64.6,43.5 88.8,43.9 93.2,43.9 90.8,44.2 75.1,44.4 100.6,44.4 20.45,44.75 90.1,44.9 2.5,45 94.2,45.1 95.3,45.5 93.5,45.8 95.9,46.5 94.4,46.7 68.5,47.2 95,47.4 113.7,47.4 119.2,47.5 157.5,47.5 97,47.6 104.5,47.8 58.9,48.3 96.1,48.5 98,48.8 97.3,49.7 98.5,50.9 107.6,51.3 118.95,53.4 130.4,53.9 110.9,54 104.5,54.1 118.25,54.7 113.6,57 2.5,57.5 83.8,57.6 116.15,57.6 119.981,57.8 87.4,57.9 87.4,58.6 82.2,58.7 157.5,58.8 86,58.9 86.9,59.6 112.2,59.6 86.1,59.7 83.9,60 87.4,60.6 28.2,60.8 87,61.6 88.4,61.6 91.1,62.1 111.65,62.399 120.1,62.6 2.5,63.1 88.3,63.2 89.6,63.2 31.3,63.3 110.1,63.4 130.2,64.3 119.88,64.686 113.134,64.807 111.3,64.84 89.3,64.9 25.4,65.6 26.6,66.5 34.2,66.6 125.9,66.8 103.22,67.3 76.5,67.4 97.7,67.4 74.85,67.45 75.7,67.45 108.2,67.9 122.6,68.2 157.6,68.6 121.6,68.7 18.5,68.8 90.6,69.4 104.9,69.5 92.65,69.75 20.4,69.9 69.6,70.09 67.2,70.2 92.75,70.55 42.1,70.7 51.5,70.7 60.1,70.8 94.35,70.8 10.2,71 1.2,71.4 128.6,71.7 94.2,71.85 107.8,72.1 95.6,72.15 123.6,72.2 13.9,72.5 15.15,72.5 22.8,72.6 96.8,72.65 114.6,72.7 95.6,72.85 123.6,73 112.2,73.4 13.85,74.1 15.15,74.1 78.5,74.4 95.45,74.65 94.8,74.75 119.645,74.8 67.4,74.9 97.4,75.2 94.75,75.6 101.6,75.7 103.4,75.7 107.5,75.9 1.2,76 34,76 126.4,77.8 32.5,78 34.7,78.5 25,78.6 16.5,78.8 31.6,78.9 33.7,79.4 43.75,79.5 45.25,79.5 35.8,79.6 42.2,79.655 122.4,79.7 32.7,80 47.15,80.1 34.9,80.5 96.7,80.5 9.3,80.7 6.2,80.8 7.75,80.8 45.25,80.85 42.15,80.9 43.75,80.9 46.75,80.9 48.6,81 105.1,81.2 103.3,81.9 88.5,81.98 90.6,82.1 92.1,82.1 1.1,82.2 157.5,82.5 101.2,83.2 103.5,83.2 105.95,83.2 108.25,83.2 110.35,83.2 112.95,83.2 113.35,84.1 120.7,84.2 76.658,84.255 96.35,84.5 87.1,85.538 52.05,85.9 96.35,86.1 38.45,87.1 25,87.2 42.5,87.2 49.05,87.2 34.8,87.3 2.5,87.5 7.5,87.5 15,87.5 96.35,87.5 130,87.5 136.5,87.5 144,87.5 150.9,87.5 157.5,87.5 87,88.85 58.1,88.9 77.7,88.9 96.35,88.9 113.45,89 20.6,89.1 24.2,89.1 36.8,89.1 53.2,89.1 46.5,89.2
GPIO2: J8.3 Module1.58 | length 122.2
  F.Cu w0.13: v1(109,67.9) 113.22,67.9 114.72,66.4 Module1.58@115.42,66.4
  B.Cu w0.13: J8.3@10.91,51.23 12.15,52.47 12.15,54.4 17.35,59.6 29.65,59.6 37.15,67.1 69.8,67.1 78.88,58.02 83.974,58.02 85.194,56.8 87.2,56.8 97.05,66.65 105.05,66.65 106.9,68.5 108.4,68.5 v1(109,67.9)
GPIO3: J8.5 Module1.56 | length 119.5
  F.Cu w0.13: v1(107.4,67.8) 107.8,67.4 113.1,67.4 114.5,66 Module1.56@115.42,66
  B.Cu w0.13: J8.5@13.45,51.23 14.7,52.48 14.7,54.8 19.05,59.15 29.85,59.15 37.4,66.7 69.5,66.7 79.2,57 84.3,57 84.9,56.4 87.4,56.4 97.2,66.2 105.2,66.2 106.7,67.7 107.3,67.7 v1(107.4,67.8)
GPIO4: J8.7 Module1.54 | length 116.1
  F.Cu w0.13: v1(113.06,66.447) 113.817,65.69 114.835,65.69 114.925,65.6 Module1.54@115.42,65.6
  B.Cu w0.13: J8.7@15.99,51.23 17.3,52.54 17.3,54.3 21.25,58.25 30.25,58.25 37.8,65.8 69,65.8 79.4,55.4 87.6,55.4 97.5,65.3 105.7,65.3 107.3,66.9 112.607,66.9 v1(113.06,66.447)
GPIO5: J8.29 Module1.34 | length 85.6
  F.Cu w0.13: v1(113.815,61.17) 114.04,61.395 114.04,61.474 114.282,61.716 114.752,61.716 114.868,61.6 Module1.34@115.42,61.6
  B.Cu w0.13: J8.29@43.93,51.23 45.15,52.45 45.15,54.175 50.315,59.34 65.76,59.34 76.2,48.9 90.7,48.9 100.25,58.45 108.65,58.45 110.766,60.566 113.211,60.566 v1(113.815,61.17)
GPIO6: J8.31 Module1.30 | length 82.7
  F.Cu w0.13: v1(111.4,59.7) 111.959,60.259 113.033,60.259 113.436,60.662 114.595,60.662 114.663,60.73 114.73,60.73 114.8,60.8 Module1.30@115.42,60.8
  B.Cu w0.13: J8.31@46.47,51.23 47.75,52.51 47.75,54.4 51.93,58.58 65.32,58.58 75.8,48.1 91.1,48.1 100.6,57.6 109.3,57.6 v1(111.4,59.7)
GPIO7: J8.26 Module1.37 | length 99.3
  F.Cu w0.13: Module1.37@118.5,62.4 119.075,62.4 119.15,62.325 119.275,62.325 v1(119.5,62.1)
  B.Cu w0.13: J8.26@38.85,53.72 38.85,56.6 ; J8.26@38.85,53.77 38.85,56.6 ; v1(119.5,62.1) 119.275,62.325 113.117,62.325 112.348,61.556 109.856,61.556 108.05,59.75 99.75,59.75 90.1,50.1 76.8,50.1 66.32,60.58 43.43,60.58 42.65,59.8 42.65,58.85 41.9,58.1 40.15,58.1 38.85,56.8 38.85,56.6
GPIO8: J8.24 Module1.39 | length 101.5
  F.Cu w0.13: Module1.39@118.5,62.8 v1(119.4,62.8)
  B.Cu w0.13: J8.24@36.31,53.67 36.31,56.81 ; J8.24@36.31,53.77 36.31,56.81 ; v1(119.4,62.8) 119.275,62.675 113.525,62.675 113.301,62.899 111.425,62.899 110.765,62.239 109.239,62.239 107.6,60.6 99.4,60.6 89.7,50.9 77.3,50.9 66.8,61.4 40.9,61.4 36.31,56.81
GPIO9: J8.21 Module1.40 | length 97.7
  F.Cu w0.13: v1(113.9,63.2) 114.39,62.71 114.835,62.71 114.925,62.8 Module1.40@115.42,62.8
  B.Cu w0.13: J8.21@33.77,51.23 35.1,52.56 35.1,52.6 35.1,56.3 40.6,61.8 67,61.8 77.5,51.3 89.5,51.3 99.2,61 107.4,61 108.969,62.569 110.499,62.569 111.13,63.2 v1(113.9,63.2)
GPIO10: J8.19 Module1.44 | length 99.9
  F.Cu w0.13: v1(109.2,63.4) 109.7,63.9 110.625,63.9 110.925,63.6 113.575,63.6 113.665,63.69 114.835,63.69 114.925,63.6 Module1.44@115.42,63.6
  B.Cu w0.13: J8.19@31.23,51.23 32.5,52.5 32.5,55.1 40,62.6 67.4,62.6 77.9,52.1 89.1,52.1 98.9,61.9 107.1,61.9 108.6,63.4 v1(109.2,63.4)
GPIO11: J8.23 Module1.38 | length 95.4
  F.Cu w0.13: v1(112.3,62.409) 112.333,62.376 114.968,62.376 114.992,62.4 Module1.38@115.42,62.4
  B.Cu w0.13: J8.23@36.31,51.23 37.55,52.47 37.55,57.4 41.15,61 66.6,61 77.1,50.5 89.9,50.5 99.6,60.2 107.9,60.2 109.609,61.909 111.8,61.909 v1(112.3,62.409)
GPIO12: J8.32 Module1.31 | length 83.9
  F.Cu w0.13: v1(117.3,61.4) 117.5,61.2 Module1.31@118.5,61.2
  B.Cu w0.13: J8.32@46.47,53.77 51.66,58.96 51.71,58.96 65.54,58.96 76,48.5 90.9,48.5 100.4,58 108.8,58 111.036,60.236 113.669,60.236 114.147,60.713 116.295,60.713 116.982,61.4 v1(117.3,61.4)
GPIO13: J8.33 Module1.28 | length 79.9
  F.Cu w0.13: v1(113,59.5) 113.832,60.332 114.732,60.332 114.8,60.4 Module1.28@115.42,60.4
  B.Cu w0.13: J8.33@49.01,51.23 50.3,52.52 50.3,54.213 54.287,58.2 65.1,58.2 75.6,47.7 91.3,47.7 100.75,57.15 110.55,57.15 112.9,59.5 v1(113,59.5)
GPIO14: J8.8 Module1.55 | length 117.2
  F.Cu w0.13: v1(117.757,66.222) 117.798,66.222 118.02,66 Module1.55@118.5,66
  B.Cu w0.13: J8.8@15.99,53.77 20.92,58.7 30.05,58.7 37.55,66.2 69.3,66.2 79.64,55.86 87.46,55.86 97.35,65.75 105.45,65.75 107,67.3 113.8,67.3 114.345,66.755 116.545,66.755 117.078,66.222 v1(117.757,66.222)
GPIO15: J8.10 Module1.51 | length 114.5
  F.Cu w0.13: v1(116.3,65.957) 117.162,65.095 117.915,65.095 118.02,65.2 Module1.51@118.5,65.2
  B.Cu w0.13: J8.10@18.53,53.77 22.56,57.8 30.5,57.8 38.1,65.4 68.8,65.4 79.2,55 87.8,55 97.65,64.85 105.85,64.85 107.5,66.5 112.282,66.5 112.825,65.957 v1(116.3,65.957)
GPIO16: J8.36 Module1.29 | length 80.1
  F.Cu w0.13: Module1.29@118.5,60.8 119.175,60.8 v1(119.275,60.7)
  B.Cu w0.13: J8.36@51.55,53.77 55.58,57.8 64.9,57.8 75.4,47.3 91.5,47.3 100.95,56.75 110.85,56.75 114.483,60.383 116.568,60.383 116.885,60.7 v1(119.275,60.7)
GPIO17: J8.11 Module1.50 | length 110.5
  F.Cu w0.13: v1(113.9,65.1) 114.29,64.71 114.835,64.71 114.925,64.8 Module1.50@115.42,64.8
  B.Cu w0.13: J8.11@21.07,51.23 22.4,52.56 22.4,54.35 25,56.95 30.9,56.95 38.45,64.5 38.5,64.5 38.6,64.6 68.4,64.6 78.8,54.2 88.2,54.2 97.95,63.95 106.15,63.95 107.9,65.7 112.074,65.7 112.478,65.297 113.703,65.297 v1(113.9,65.1)
GPIO18: J8.12 Module1.49 | length 113.6
  F.Cu w0.13: Module1.49@118.5,64.8 119.118,64.8 119.275,64.957 v1(119.275,65.1)
  B.Cu w0.13: J8.12@21.07,53.77 24.65,57.35 30.7,57.35 38.35,65 68.6,65 79,54.6 88,54.6 97.8,64.4 106,64.4 107.7,66.1 112.215,66.1 112.625,65.69 114.93,65.69 115.91,64.71 116.968,64.71 117.358,65.1 v1(119.275,65.1)
GPIO19: J8.35 Module1.26 | length 77.5
  F.Cu w0.13: v1(114,59.095) 114,59.6 114.4,60 Module1.26@115.42,60
  B.Cu w0.13: J8.35@51.55,51.23 52.82,52.5 52.85,52.5 52.85,54.188 56.062,57.4 64.7,57.4 75.2,46.9 91.8,46.9 101.25,56.35 111.255,56.35 v1(114,59.095)
GPIO20: J8.38 Module1.27 | length 75.9
  F.Cu w0.13: v1(116.9,59.99) 117.31,60.4 Module1.27@118.5,60.4
  B.Cu w0.13: J8.38@54.09,53.77 57.31,56.99 57.41,56.99 57.42,57 64.563,57 75.081,46.481 91.981,46.481 101.35,55.85 111.65,55.85 115.79,59.99 v1(116.9,59.99)
GPIO21: J8.40 Module1.25 | length 75.6
  F.Cu w0.13: v1(117.7,58.7) 117.7,59.6 118.1,60 Module1.25@118.5,60
  B.Cu w0.13: J8.40@56.63,53.67 56.63,54.872 ; J8.40@56.63,53.77 56.63,54.872 ; v1(117.7,58.7) 117.68,58.72 116.62,58.72 113.368,55.468 101.568,55.468 92.1,46 75,46 64.4,56.6 58.358,56.6 56.63,54.872
GPIO22: J8.15 Module1.46 | length 104.7
  F.Cu w0.13: v1(110.2,64.48) 110.518,64.48 111.012,63.987 113.506,63.987 113.539,64.02 Module1.46@115.4,64.02
  B.Cu w0.13: J8.15@26.15,51.23 27.4,52.48 27.4,52.5 27.4,54.3 28.825,55.725 31.725,55.725 39.4,63.4 67.8,63.4 78.3,52.9 88.7,52.9 98.5,62.7 106.7,62.7 108.48,64.48 v1(110.2,64.48)
GPIO23: J8.16 Module1.47 | length 106.2
  F.Cu w0.13: v1(117.571,64.588) 117.669,64.49 117.883,64.49 117.938,64.435 118.139,64.435 118.174,64.4 Module1.47@118.54,64.4
  B.Cu w0.13: J8.16@26.15,53.77 28.53,56.15 31.45,56.15 39.1,63.8 68,63.8 78.5,53.3 88.5,53.3 98.3,63.1 106.5,63.1 108.39,64.99 110.41,64.99 111.037,64.363 117.346,64.363 v1(117.571,64.588)
GPIO24: J8.18 Module1.45 | length 104.5
  F.Cu w0.13: Module1.45@118.5,64 119.1,64 v1(119.3,64.2)
  B.Cu w0.13: J8.18@28.69,53.77 30.06,55.14 31.84,55.14 39.7,63 67.6,63 78.1,52.5 88.9,52.5 98.7,62.3 106.9,62.3 108.62,64.02 119.12,64.02 v1(119.3,64.2)
GPIO25: J8.22 Module1.41 | length 101
  F.Cu w0.13: v1(116.9,63.3) 117.125,63.075 117.797,63.075 117.922,63.2 Module1.41@118.5,63.2
  B.Cu w0.13: J8.22@33.77,53.67 33.77,55.67 ; J8.22@33.77,53.77 33.77,55.67 ; v1(116.9,63.3) 116.51,63.69 111.09,63.69 110.31,62.91 108.71,62.91 107.25,61.45 99.05,61.45 89.3,51.7 77.7,51.7 67.2,62.2 40.3,62.2 33.77,55.67
GPIO26: J8.37 Module1.24 | length 78.5
  F.Cu w0.13: Module1.24@115.42,59.6 116.427,59.6 116.8,59.227 v1(116.8,58.3)
  B.Cu w0.13: J8.37@54.09,51.23 55.36,52.5 57.2,52.5 57.8,53.1 57.8,54.8 59.2,56.2 64.2,56.2 74.9,45.5 92.2,45.5 101.7,55 113.7,55 115.7,57 116.4,57 116.8,57.4 v1(116.8,58.3)
GPIO27: J8.13 Module1.48 | length 107.9
  F.Cu w0.13: v1(112.3,64.84) 112.823,64.317 113.369,64.317 113.427,64.375 Module1.48@115.395,64.375
  B.Cu w0.13: J8.13@23.61,51.23 24.9,52.52 24.9,54.5 26.95,56.55 31.1,56.55 38.75,64.2 68.2,64.2 78.65,53.75 88.35,53.75 98.1,63.5 106.3,63.5 108.13,65.33 111.81,65.33 v1(112.3,64.84)
GPIO_VREF: Module1.78 R4.2 R5.2 R6.2 R7.2 | length 103.9
  F.Cu w0.13: R7.2@32.2,63.9 R6.2@32.2,65.4 ; R6.2@32.215,65.4 32.215,65.715 39.6,73.1 63.3,73.1 66.5,76.3 99,76.3 104.9,70.4 Module1.78@115.42,70.4
  F.Cu w0.2: Module1.78@115.42,70.4 116,70.4 117.4,71.8 117.4,76.3 118.025,76.925 118.025,78.5 R4.2@118.025,81
HDMI0_CEC: J22.13 Module1.151 | length 95.9
  F.Cu w0.13: J22.13@21.5,10.28 21.5,12.9 55.4,46.8 55.4,54.4 v1(71.2,70.2) ; v1(82.353,66.253) 82.647,66.253 83.66,65.24 Module1.151@84.54,65.24
  B.Cu w0.13: v1(71.2,70.2) 74.4,70.2 78.122,66.478 82.128,66.478 v1(82.353,66.253)
HDMI0_CK_N: J22.12 Module1.190 | length 93.5
  F.Cu w0.127: J22.12@22,10.28 22,12.23 22.31,12.54 22.31,12.879 50.721,41.29 54.721,41.29 65.21,51.779 65.21,63.379 74.621,72.79 80.965,72.79 80.975,72.8 Module1.190@81.5,72.8
HDMI0_CK_P: J22.10 Module1.188 | length 95.3
  F.Cu w0.127: J22.10@23,10.28 23,12.23 22.69,12.54 22.69,12.721 50.879,40.91 54.879,40.91 65.59,51.621 65.59,63.19 74.8,72.4 75.235,72.4 cw(c75.235,72.304) 75.331,72.304 cw(c75.426,72.304) 75.426,72.208 75.492,72.208 cw(c75.492,72.304) 75.588,72.304 cw(c75.683,72.304) 75.683,72.4 75.749,72.4 cw(c75.749,72.304) 75.845,72.304 cw(c75.94,72.304) 75.94,72.208 76.006,72.208 cw(c76.006,72.304) 76.102,72.304 cw(c76.197,72.304) 76.197,72.4 76.263,72.4 cw(c76.263,72.304) 76.359,72.304 cw(c76.454,72.304) 76.454,72.208 76.52,72.208 cw(c76.52,72.304) 76.616,72.304 cw(c76.711,72.304) 76.711,72.4 76.777,72.4 78.145,72.4 Module1.188@81.5,72.4
HDMI0_D0_N: J22.9 Module1.184 | length 92
  F.Cu w0.127: J22.9@23.5,10.28 23.5,12.19 23.81,12.5 23.81,12.879 51.021,40.09 55.354,40.09 66.21,50.946 66.21,62.979 75.021,71.79 80.379,71.79 80.579,71.59 80.965,71.59 80.975,71.6 Module1.184@81.5,71.6
HDMI0_D0_P: J22.7 Module1.182 | length 91.9
  F.Cu w0.127: J22.7@24.5,10.28 24.5,13.031 51.179,39.71 55.511,39.71 66.59,50.789 66.59,62.84 75.113,71.363 75.638,71.363 75.653,71.339 75.662,71.313 75.668,71.257 75.677,71.231 75.692,71.207 75.712,71.187 75.736,71.172 75.762,71.163 75.79,71.16 75.84,71.16 75.868,71.163 75.894,71.172 75.918,71.187 75.938,71.207 75.953,71.231 75.962,71.257 75.968,71.313 75.977,71.339 75.992,71.363 76.012,71.383 76.036,71.398 76.062,71.407 76.09,71.41 76.14,71.41 76.168,71.407 76.194,71.398 76.218,71.383 76.238,71.363 76.253,71.339 76.262,71.313 76.268,71.257 76.277,71.231 76.292,71.207 76.312,71.187 76.336,71.172 76.362,71.163 76.39,71.16 76.44,71.16 76.468,71.163 76.494,71.172 76.518,71.187 76.538,71.207 76.553,71.231 76.562,71.257 76.568,71.313 76.577,71.339 76.592,71.363 76.612,71.383 76.636,71.398 76.662,71.407 76.69,71.41 76.74,71.41 76.768,71.407 76.794,71.398 76.818,71.383 76.838,71.363 76.853,71.339 76.862,71.313 76.868,71.257 76.877,71.231 76.892,71.207 76.912,71.187 76.936,71.172 76.962,71.163 76.99,71.16 77.04,71.16 77.068,71.163 77.094,71.172 77.118,71.187 77.138,71.207 77.153,71.231 77.162,71.257 77.168,71.313 77.177,71.339 77.192,71.363 77.212,71.383 77.236,71.398 77.262,71.407 77.29,71.41 77.854,71.41 79.346,71.41 80.221,71.41 80.421,71.21 80.965,71.21 80.975,71.2 Module1.182@81.5,71.2
HDMI0_D1_N: J22.6 Module1.178 | length 90.4
  F.Cu w0.127: J22.6@25,10.28 25,12.769 51.021,38.79 56.221,38.79 67.31,49.879 67.31,62.779 74.921,70.39 80.965,70.39 80.975,70.4 Module1.178@81.5,70.4
HDMI0_D1_P: J22.4 Module1.176 | length 90.4
  F.Cu w0.127: J22.4@26,10.28 26,12.23 25.69,12.54 25.69,12.921 51.179,38.41 56.379,38.41 67.69,49.721 67.69,62.64 75.006,69.956 75.502,69.956 75.519,69.929 75.53,69.898 75.537,69.834 75.548,69.804 75.565,69.777 75.588,69.754 75.615,69.737 75.645,69.726 75.677,69.723 75.69,69.723 75.722,69.726 75.752,69.737 75.78,69.754 75.802,69.777 75.819,69.804 75.83,69.834 75.837,69.898 75.848,69.929 75.865,69.956 75.888,69.979 75.915,69.996 75.945,70.006 75.977,70.01 75.99,70.01 76.022,70.006 76.052,69.996 76.08,69.979 76.102,69.956 76.119,69.929 76.13,69.898 76.137,69.834 76.148,69.804 76.165,69.777 76.188,69.754 76.215,69.737 76.245,69.726 76.277,69.723 76.29,69.723 76.322,69.726 76.352,69.737 76.38,69.754 76.402,69.777 76.419,69.804 76.43,69.834 76.437,69.898 76.448,69.929 76.465,69.956 76.488,69.979 76.515,69.996 76.545,70.006 76.577,70.01 80.965,70.01 80.975,70 Module1.176@81.5,70
HDMI0_D2_N: J22.3 Module1.172 | length 88.8
  F.Cu w0.127: J22.3@26.5,10.28 26.5,12.23 26.81,12.54 26.81,12.979 51.421,37.59 57.057,37.59 68.41,48.943 68.41,62.579 75.021,69.19 80.965,69.19 80.975,69.2 Module1.172@81.5,69.2